# Altium PCB DB31.PcbDoc (part 6 of 8)
Units mil, origin at the board's own origin, x right, y up, seen from the top; angles counter-clockwise.
Board outline 3236.22 x 4456.69 mil, 8 copper layers (Top Layer, MidLayer1, MidLayer2, GND-Layer5, MidLayer3, VCC, MidLayer4, Bottom Layer), stack 61.8 mil thick; 226 components, 469 nets, 1815 pads, 1562 vias.
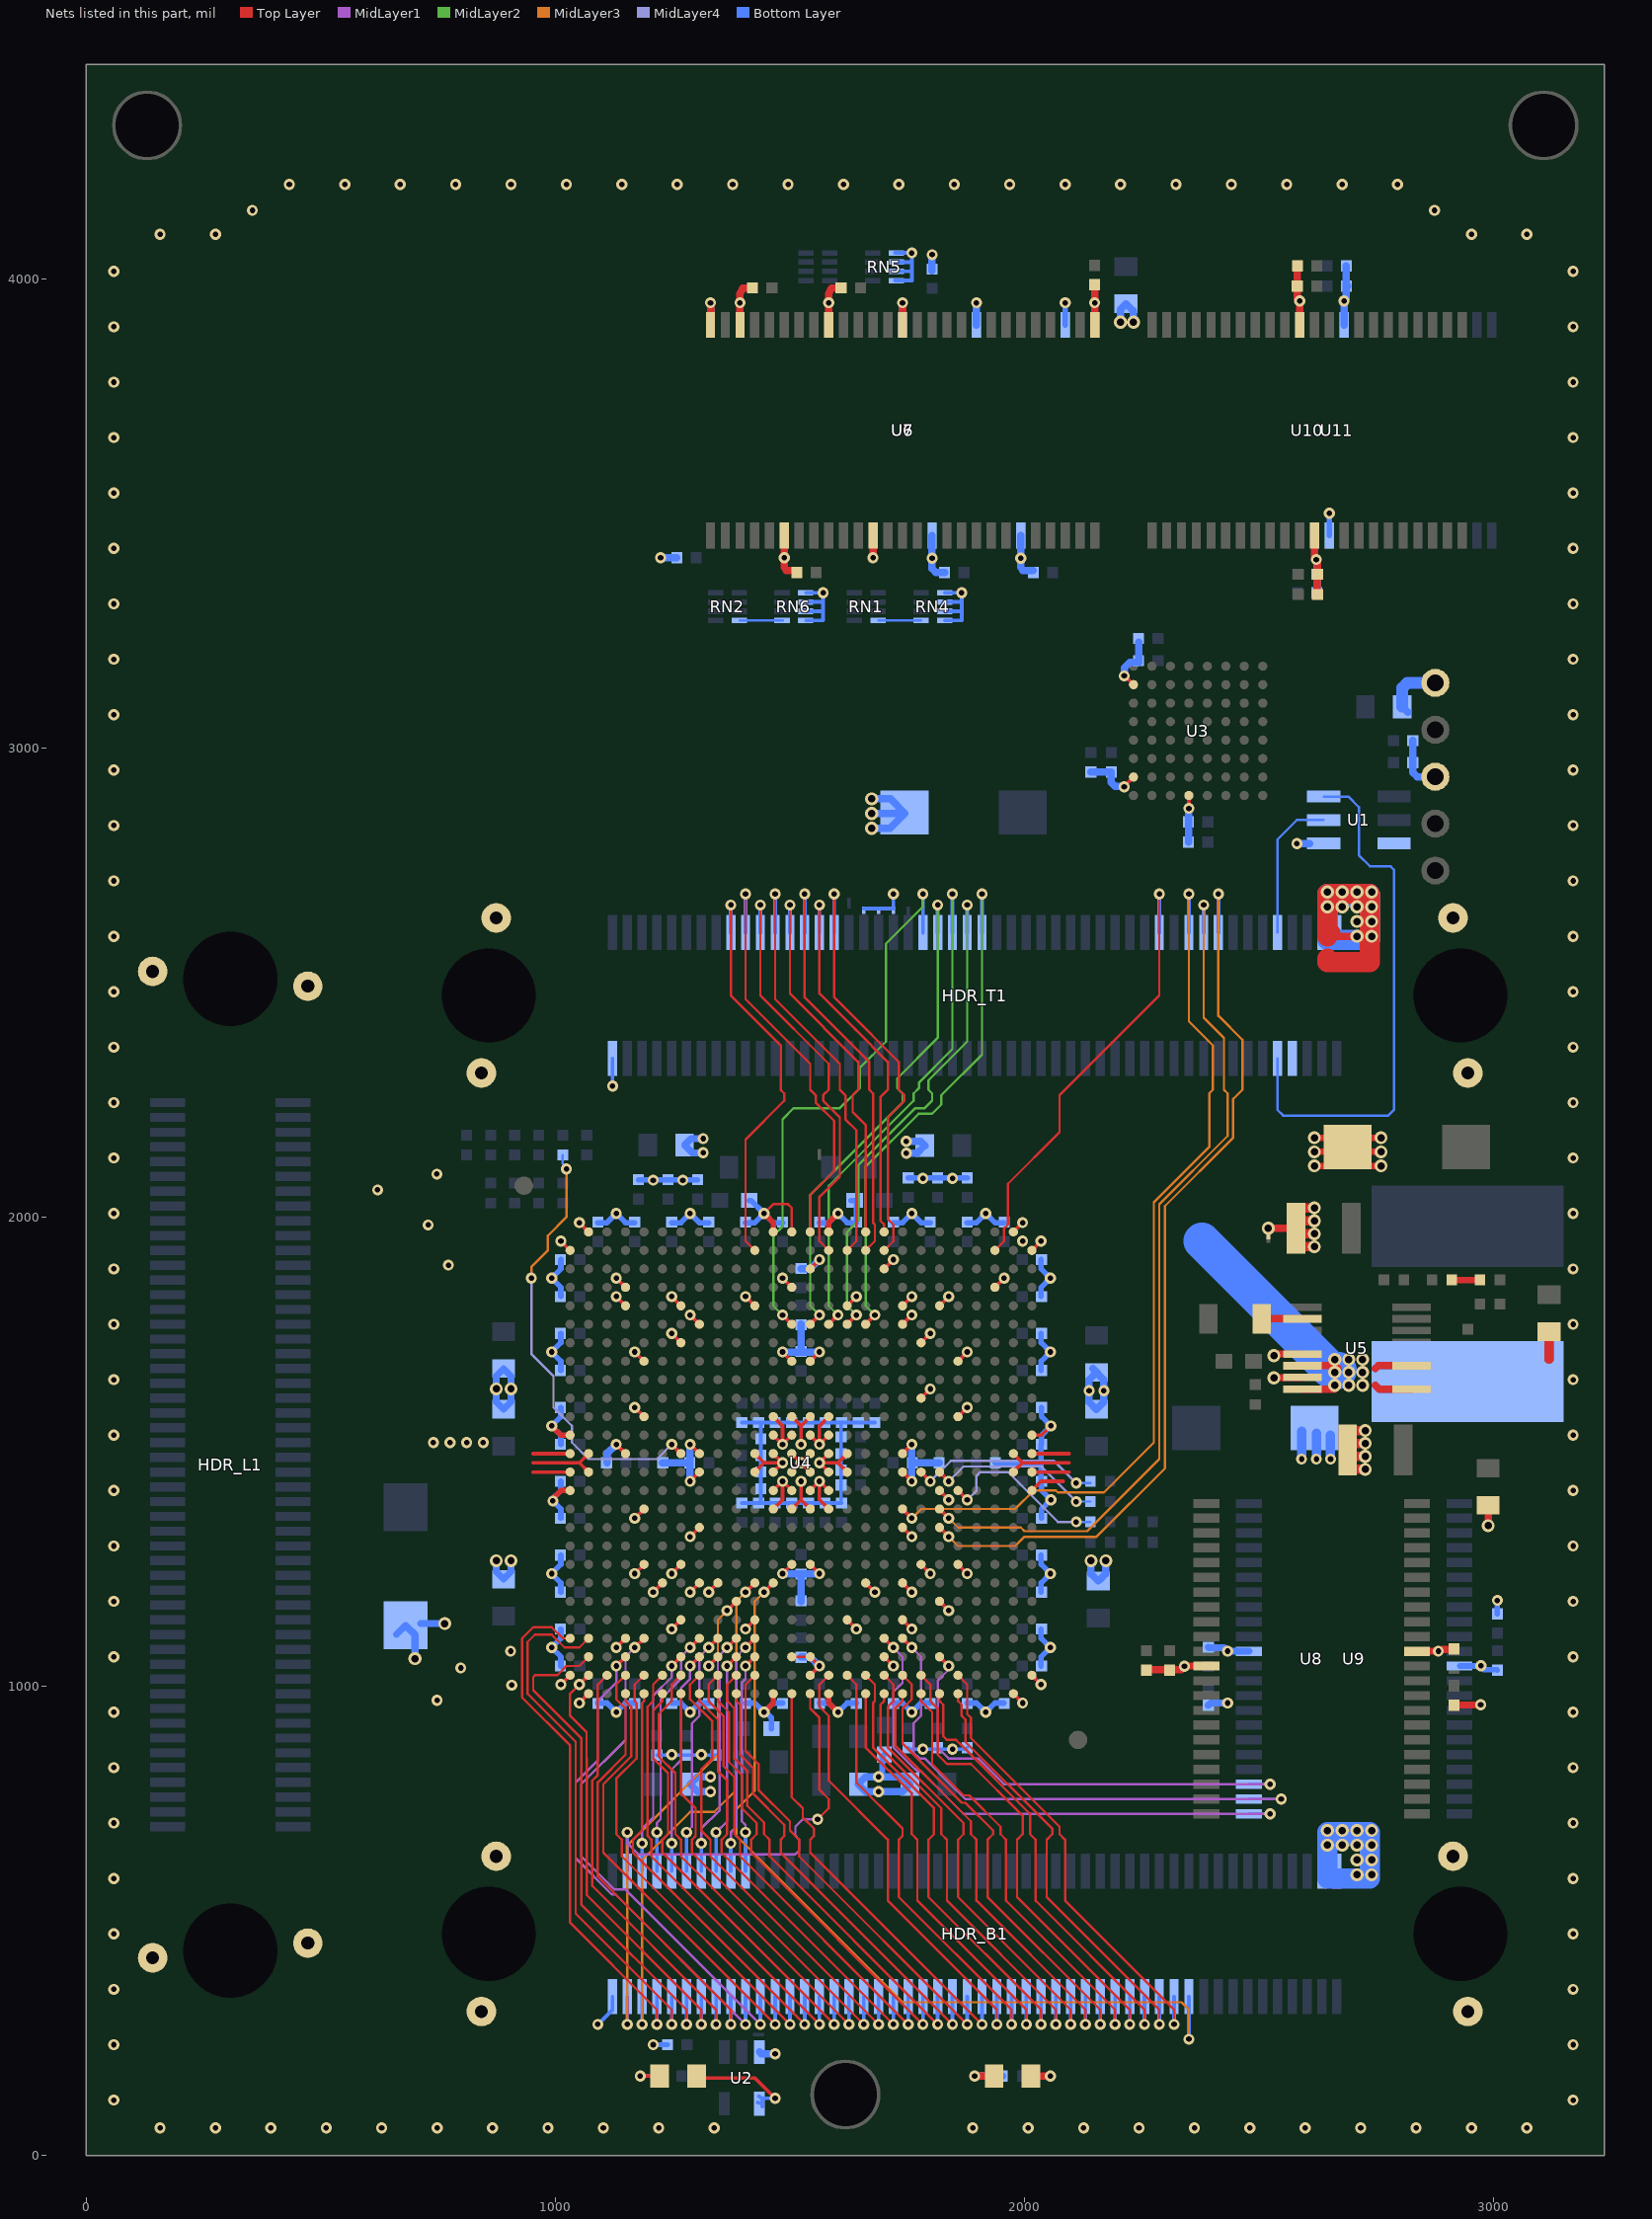
[diagram p12: the nets of this part, all layers, seen from the top]

## Via types
v1: diameter 23.62, hole 11.81, Top Layer to Bottom Layer, 947 vias
v2: diameter 23.62, hole 11.81, Top Layer to Bottom Layer, tented both sides, 476 vias
v3: diameter 27.56, hole 15.75, Top Layer to Bottom Layer, 138 vias
v4: diameter 23.62, hole 11.81, Top Layer to Bottom Layer, tented top, 1 vias

## Nets (pads, with @x,y where several pads share a name; then routed paths per layer and width w, separated by ;. In a path a pad name is that pad's centre, name@x,y a point inside that pad or via, vN(x,y) a via of type N, cw(c..) or ccw(c..) an arc to the next point about the centre after c; other vN are vias at no path point) (continued)
GND: C1.1 C2.2 C3.2 C4.2 C5.2 C6.2 C7.2 C8.2 C9.2 C10.2 C11.2 C12.2 C13.2 C14.2 C15.2 C16.2 C17.2 C18.2 C19.2 C20.2 C21.2 C22.2 C23.2 C24.2 C25.2 C26.2 C27.2 C28.2 C29.2 C30.2 C31.2 C32.2 C33.2 C34.2 C35.2 C36.2 C37.2 C38.2 C39.2 C40.2 C41.2 C42.2 C43.2 C44.2 C45.2 C46.2 C47.2 C48.2 C49.2 C50.2 C51.2 C52.2 C53.2 C54.2 C55.2 C56.2 C57.2 C58.2 C59.2 C60.2 C61.2 C62.2 C63.2 C64.2 C65.2 C66.2 C67.2 C68.2 C69.2 C70.2 C71.2 C72.2 C73.2 C74.2 C75.2 C76.2 C77.2 C78.2 C79.2 C80.2 C81.2 C82.2 C83.2 C84.2 C85.2 C86.2 C87.2 C88.2 C89.2 C90.2 C91.2 C92.2 C93.2 C94.2 C95.2 C96.2 C97.2 C98.2 C99.2 C100.2 C101.1 C102.2 C103.2 C104.2 C105.2 C106.2 C107.2 C108.2 C109.2 C110.2 C111.2 C112.2 C113.2 C114.2 C115.2 C116.2 C117.2 C118.2 C119.2 C120.2 C121.2 C122.2 C123.2 C124.2 C125.2 C128.2 C129.2 C130.2 C131.2 C132.2 C134.2 C135.2 C136.2 C137.2 C138.2 C139.2 C140.2 C141.2 C142.2 C143.2 C144.2 C145.2 C146.2 C147.2 C148.2 C149.2 C150.2 C151.2 C152.2 C153.2 C154.2 C155.2 C156.2 C157.2 HDR_B1.1 HDR_B1.98 HDR_B1.100 HDR_B1.MH1 HDR_B1.MH2 HDR_B1.MH3 HDR_B1.MH4 HDR_L1.MH1 HDR_L1.MH2 HDR_L1.MH3 HDR_L1.MH4 HDR_T1.1 HDR_T1.98 HDR_T1.100 HDR_T1.MH1 HDR_T1.MH2 HDR_T1.MH3 HDR_T1.MH4 LED2.2 NT5.2 NT6.2 NT7.2 NT8.2 RN4.1 RN4.2 RN4.3 RN4.4 RN5.1 RN5.2 RN5.3 RN5.4 RN6.1 RN6.2 RN6.3 RN6.4 TP1.1 TP3.1 U1.1 U2.3 U3.E8 U3.H2 U3.H7 U4.A2 U4.A12 U4.A13 U4.A15 U4.A25 U4.AA21 U4.AB7 U4.AB11 U4.AB16 U4.AB19 U4.AC4 U4.AD9 U4.AD13 U4.AD14 U4.AD18 U4.AE1 U4.AE14 U4.AE26 U4.AF2 U4.AF12 U4.AF15 U4.AF25 U4.B1 U4.B26 U4.C14 U4.C18 U4.D4 U4.D13 U4.D24 U4.E4 U4.E7 U4.E11 U4.E16 U4.E19 U4.E21 U4.F8 U4.F19 U4.G7 U4.G20 U4.H5 U4.H13 U4.H14 U4.H22 U4.K20 U4.L5 U4.L12 U4.L13 U4.L14 U4.L15 U4.L22 U4.M1 U4.M12 U4.M13 U4.M14 U4.M15 U4.M26 U4.N1 U4.N2 U4.N4 U4.N8 U4.N11 U4.N12 U4.N13 U4.N14 U4.N15 U4.N16 U4.N19 U4.N25 U4.N26 U4.P1 U4.P2 U4.P8 U4.P11 U4.P12 U4.P13 U4.P14 U4.P15 U4.P16 U4.P19 U4.P25 U4.P26 U4.R1 U4.R12 U4.R13 U4.R14 U4.R15 U4.R21 U4.R26 U4.T5 U4.T12 U4.T13 U4.T14 U4.T15 U4.U8 U4.U19 U4.W5 U4.W7 U4.W13 U4.W14 U4.W20 U4.W22 U4.Y6 U4.Y8 U4.Y9 U4.Y17 U4.Y19 U5.13 U5.15 U6.6 U6.12 U6.28 U6.41 U6.46 U6.52 U6.54 U7.6 U7.12 U7.28 U7.41 U7.46 U7.52 U7.54 U8.12 U8.34 U9.12 U9.34 U10.12 U10.34 U11.12 U11.34 | length 16400.1
  Top Layer w5: v1(1444.88,2007.87) 1464.57,2027.56 1496.06,2027.56 1503.94,2019.68 U4.A13@1503.94,1968.5 ; U4.AD13@1503.94,1062.99 U4.AD14@1543.31,1062.99
  Top Layer w7.87: 952.76,1456.69 U4.P1@1031.5,1456.69 ; 952.76,1476.38 1011.81,1476.38 1051.18,1476.38 ; 952.76,1496.06 U4.N1@1031.5,1496.06 ; v1(1011.81,1003.93) U4.AE1@1031.5,1023.62 ; v1(1011.81,1948.82) U4.B1@1031.5,1929.13 ; v1(1051.18,964.56) U4.AF2@1070.87,984.25 ; v1(1051.18,1988.19) U4.A2@1070.87,1968.5 ; U4.P2@1070.87,1456.69 1051.18,1476.38 ; U4.N2@1070.87,1496.06 1051.18,1476.38 ; v1(1129.92,1082.67) U4.AC4@1149.61,1102.36 ; v1(1129.92,1515.75) U4.N4@1149.61,1496.06 ; v1(1129.92,1830.71) U4.E4@1149.61,1811.02 ; v1(1129.92,1870.08) U4.D4@1149.61,1850.39 ; v1(1169.29,1240.16) U4.W5@1188.98,1259.84 ; v1(1169.29,1358.27) U4.T5@1188.98,1377.95 ; v1(1169.29,1594.49) U4.L5@1188.98,1574.8 ; v1(1169.29,1712.6) U4.H5@1188.98,1692.91 ; v1(1208.66,1200.78) U4.Y6@1228.35,1220.47 ; v1(1248.03,1122.04) U4.AB7@1267.72,1141.73 ; v1(1248.03,1240.16) U4.W7@1267.72,1259.84 ; v1(1248.03,1751.97) U4.G7@1267.72,1732.28 ; v1(1248.03,1830.71) U4.E7@1267.72,1811.02 ; v1(1287.4,1200.78) U4.Y8@1307.09,1220.47 ; v1(1287.4,1318.9) U4.U8@1307.09,1338.58 ; v1(1287.4,1437.01) U4.P8@1307.09,1456.69 ; v1(1287.4,1515.75) U4.N8@1307.09,1496.06 ; v1(1287.4,1791.34) U4.F8@1307.09,1771.65 ; v1(1326.77,1043.3) U4.AD9@1346.46,1062.99 ; v1(1326.77,1200.78) U4.Y9@1346.46,1220.47 ; v1(1405.51,1122.04) U4.AB11@1425.2,1141.73 ; v1(1405.51,1830.71) U4.E11@1425.2,1811.02 ; U4.P11@1425.2,1456.69 1444.88,1476.38 ; U4.N11@1425.2,1496.06 1444.88,1476.38 ; U4.T12@1464.57,1377.95 1484.25,1397.64 v1(1484.25,1437.01) ; U4.R12@1464.57,1417.32 v1(1484.25,1437.01) ; U4.P12@1464.57,1456.69 v1(1484.25,1476.38) ; U4.N12@1464.57,1496.06 v1(1484.25,1476.38) ; U4.M12@1464.57,1535.43 v1(1484.25,1515.75) ; U4.L12@1464.57,1574.8 1484.25,1555.12 v1(1484.25,1515.75) ; v1(1484.25,1240.15) U4.W13@1503.94,1259.84 ; v1(1484.25,1712.6) U4.H13@1503.94,1692.91 ; v1(1484.25,1870.08) U4.D13@1503.94,1850.39 ; U4.T13@1503.94,1377.95 1523.62,1397.64 ; U4.R13@1503.94,1417.32 v1(1484.25,1437.01) ; U4.P13@1503.94,1456.69 v1(1523.62,1476.38) ; U4.N13@1503.94,1496.06 v1(1523.62,1476.38) ; U4.M13@1503.94,1535.43 v1(1484.25,1515.75) ; U4.L13@1503.94,1574.8 1523.62,1555.12 ; v1(1523.62,1437.01) 1523.62,1397.64 ; v1(1523.62,1515.75) 1523.62,1555.12 ; U4.AE14@1543.31,1023.62 v1(1562.99,1043.3) U4.AD14@1543.31,1062.99 ; U4.W14@1543.31,1259.84 v1(1562.99,1240.16) ; U4.T14@1543.31,1377.95 1523.62,1397.64 ; U4.R14@1543.31,1417.32 v1(1562.99,1437.01) ; U4.P14@1543.31,1456.69 v1(1523.62,1476.38) ; U4.N14@1543.31,1496.06 v1(1523.62,1476.38) ; U4.M14@1543.31,1535.43 v1(1562.99,1515.75) ; U4.L14@1543.31,1574.8 1523.62,1555.12 ; U4.H14@1543.31,1692.91 v1(1562.99,1712.6) ; U4.C14@1543.31,1889.76 v1(1562.99,1909.45) ; U4.T15@1582.68,1377.95 1562.99,1397.64 v1(1562.99,1437.01) ; U4.R15@1582.68,1417.32 v1(1562.99,1437.01) ; U4.P15@1582.68,1456.69 v1(1562.99,1476.38) ; U4.N15@1582.68,1496.06 v1(1562.99,1476.38) ; U4.M15@1582.68,1535.43 v1(1562.99,1515.75) ; U4.L15@1582.68,1574.8 1562.99,1555.12 v1(1562.99,1515.75) ; U4.AB16@1622.05,1141.73 v1(1641.73,1122.04) ; U4.P16@1622.05,1456.69 1602.36,1476.38 ; U4.N16@1622.05,1496.06 1602.36,1476.38 ; U4.E16@1622.05,1811.02 v1(1641.73,1830.71) ; U4.Y17@1661.42,1220.47 v1(1681.1,1200.78) ; U4.AD18@1700.79,1062.99 v1(1720.47,1043.3) ; U4.C18@1700.79,1889.76 v1(1720.47,1909.45) ; U4.AB19@1740.16,1141.73 v1(1759.84,1122.04) ; U4.Y19@1740.16,1220.47 v1(1759.84,1200.78) ; U4.U19@1740.16,1338.58 v1(1759.84,1318.9) ; U4.P19@1740.16,1456.69 v1(1759.84,1437.01) ; U4.N19@1740.16,1496.06 v1(1759.84,1515.75) ; U4.F19@1740.16,1771.65 v1(1759.84,1791.34) ; U4.E19@1740.16,1811.02 v1(1759.84,1830.71) ; U4.W20@1779.53,1259.84 v1(1799.22,1240.16) ; U4.K20@1779.53,1614.17 v1(1799.22,1633.86) ; U4.G20@1779.53,1732.28 v1(1799.21,1751.97) ; U4.AA21@1818.9,1181.1 v1(1838.59,1161.41) ; U4.R21@1818.9,1417.32 v1(1838.59,1397.64) ; U4.E21@1818.9,1811.02 v1(1838.58,1830.71) ; U4.W22@1858.27,1259.84 v1(1877.96,1240.16) ; U4.L22@1858.27,1574.8 v1(1877.96,1594.49) ; U4.H22@1858.27,1692.91 v1(1877.96,1712.6) ; U4.D24@1937.01,1850.39 v1(1956.7,1870.08) ; U4.AF25@1976.38,984.25 v1(1996.07,964.57) ; U4.P25@1976.38,1456.69 1996.06,1476.38 ; U4.N25@1976.38,1496.06 1996.06,1476.38 ; U4.A25@1976.38,1968.5 v1(1996.06,1988.19) ; U4.AE26@2015.75,1023.62 v1(2035.44,1003.94) ; U4.R26@2015.75,1417.32 2035.43,1437.01 2082.68,1437.01 ; U4.P26@2015.75,1456.69 2094.49,1456.69 ; U4.N26@2015.75,1496.06 2094.49,1496.06 ; U4.M26@2015.75,1535.43 2036.42,1535.43 v1(2056.1,1555.11) ; U4.B26@2015.75,1929.13 v1(2035.43,1948.82) ; 2094.49,1476.38 1996.06,1476.38 ; v1@2212.6,2918.31 U3.H7@2232.28,2937.99 ; v1@2212.6,3154.53 U3.H2@2232.28,3134.84 ; v1(2350.4,2871.07) U3.E8@2350.39,2898.62 ; 1444.88,1476.38 v1(1484.25,1476.38) ; v1(1562.99,1476.38) 1602.36,1476.38
  Top Layer w11.81: v1@992.13,1397.64 1011.81,1417.32 U4.R1@1031.5,1417.32 ; v1(992.13,1555.12) 1011.81,1535.43 U4.M1@1031.5,1535.43 ; v1(1444.88,944.88) 1464.57,964.57 U4.AF12@1464.57,984.25 ; v1(1444.88,2007.87) 1464.57,1988.19 U4.A12@1464.57,1968.5 ; U4.AF15@1582.68,984.25 1582.68,964.57 v1(1602.36,944.88) ; U4.A15@1582.68,1968.5 1582.68,1988.19 v1(1602.36,2007.87)
  Top Layer w13.78: v3(2618.11,2109.29) C128.2@2669.08,2109.29 ; v3(2618.11,2139.29) C128.2@2669.08,2139.29 ; v3(2618.11,2169.29) C128.2@2669.08,2169.29 ; C128.2@2709.01,2109.29 v3(2759.99,2109.29) ; C128.2@2709.01,2139.29 v3(2759.99,2139.29) ; C128.2@2709.01,2169.29 v3(2759.99,2169.29)
  Top Layer w15: C145.2@2259.84,1034.45 2260.82,1035.43 2334.65,1035.43 2341,1041.79 v1(2341,1043) 2341.3,1043.3 U8.34@2387.89,1043.3 ; v3(2531.5,1657.48) 2532.26,1658.25 U5.15@2591.08,1658.25 ; v3(2531.5,1704.72) 2535.43,1708.66 U5.13@2590.55,1708.66 ; U8.12@2836.71,1074.8 2881.8,1074.8 v1(2882,1075) 2886.02,1075 2889.76,1078.74 2914.47,1078.74 C142.2@2915.44,1079.71 ; C144.2@2915.3,957.92 2917.32,957.76 2914.45,960.63 v1(2972.44,960.63)
  Top Layer w15.75: U6.54@1330.71,3901.57 v2(1330.71,3948.82) ; U6.52@1393.7,3901.57 v2(1393.7,3948.82) ; v2@1393.7,3944.88 1393.7,3964.57 ; 1393.7,3968.51 1399.61,3980.32 C138.2@1420.27,3980.31 ; C138.2@1416.34,3980.32 C138.2@1418.31,3978.34 ; U6.6@1488.19,3452.76 1488.19,3409.45 v2(1488.19,3405.51) 1488.19,3385.83 1492.13,3377.95 C135.2@1514.77,3377.95 ; U6.46@1582.68,3901.57 v2(1582.68,3948.82) ; v2@1582.68,3944.88 1582.68,3964.57 1582.68,3968.51 1588.58,3980.32 C139.2@1609.25,3980.31 ; v2(1677.17,3405.51) U6.12@1677.17,3452.76 ; U6.41@1740.16,3901.57 v2(1740.16,3948.82) ; LED2.2@2011.81,169.29 v1(2055.12,169.29) ; U6.28@2149.61,3901.57 C134.2@2149.6,3987.2 ; v3(2519.68,1976.38) C132.2@2582.67,1976.38 ; C151.2@2580.43,4028.54 C151.2@2580.57,4028.67 ; C151.2@2581.69,4027.55 2581.69,3957.68 v2(2586.61,3952.76) U10.34@2586.61,3901.57 ; U10.12@2618.11,3452.76 2618.11,3405.51 2624.72,3398.9 C154.2@2624.72,3370.07 C154.2@2625.71,3371.06 ; C150.2@2623.74,3329.72 2623.74,3370.07 C154.2@2623.77,3370.23 ; 2645.67,2598.43 v3(2708.66,2598.43) ; v3(2988.19,1342.52) C129.2@2988.18,1385.82
  Top Layer w19.68: 2645.67,2551.18 2649.61,2555.12 ; 3118.09,1696.83 C131.2@3118.1,1755.9
  Top Layer w20: C132.2@2578.73,1937 v3(2618.1,1937) ; C132.2@2578.73,1964.56 v3(2618.1,1964.56) ; C132.2@2578.73,1992.12 v3(2618.1,1992.12) ; C132.2@2578.73,2019.68 v3(2618.1,2019.68) ; C130.2@2687.01,1462.59 v3(2726.38,1462.59) ; C130.2@2687.01,1490.15 v3(2726.38,1490.15) ; C130.2@2687.01,1517.71 v3(2726.38,1517.71) ; C130.2@2687.01,1545.27 v3(2726.38,1545.27)
  Top Layer w39.37: 2645.67,2606.3 2653.54,2606.3
  Top Layer w43.31: 2645.67,2551.18 2645.67,2543.31 2736.22,2543.31 2736.22,2688.98 2645.67,2688.98 2645.67,2598.43
  Bottom Layer w7.87: v2(1090.55,279.53) 1122.05,311.02 HDR_B1.1@1122.05,338.58 ; v2(1122.05,2279.53) HDR_T1.1@1122.05,2338.58 ; C110.2@1216.53,853.34 C108.2@1342.52,853.34 ; C29.2@1397.64,1390.75 C26.2@1610.23,1390.75 ; C7.2@1397.64,1562 C11.2@1681.1,1562 ; C16.2@1437.99,1390.75 C19.2@1437.99,1527.56 C20.2@1437.99,1562 ; RN6.4@1534.64,3271.65 1570.87,3271.65 v1(1570.87,3330.71) RN6.1@1534.64,3330.71 ; RN6.3@1534.64,3291.34 1570.87,3291.34 ; RN6.2@1534.64,3311.02 1570.87,3311.02 ; C26.2@1609.25,1390.75 C10.2@1609.25,1562 ; NT7.2@1657.48,2657.48 1720.47,2657.48 v2(1720.47,2688.98) ; RN5.4@1723.62,3996.06 1759.84,3996.06 v1(1759.84,4055.12) RN5.1@1723.62,4055.12 ; RN5.3@1723.62,4015.75 1759.84,4015.75 ; RN5.2@1723.62,4035.43 1759.84,4035.43 ; C120.2@1751.97,869.09 1754.92,866.14 1875,866.14 C122.2@1877.95,869.09 ; RN4.4@1829.92,3271.65 1866.14,3271.65 v1(1866.14,3330.71) RN4.1@1829.92,3330.71 ; RN4.3@1829.92,3291.34 1866.14,3291.34 ; RN4.2@1829.92,3311.02 1866.14,3311.02
  Bottom Layer w9.84: v1(1208.66,236.22) C101.1@1239.17,236.22
  Bottom Layer w11.81: C86.2@1011.81,1043.31 1011.81,1062.99 v1(992.13,1082.68) 1011.81,1102.36 C70.2@1011.81,1122.05 ; C69.2@1011.81,1200.79 1011.81,1220.47 v1(992.13,1240.16) 1011.81,1259.84 C72.2@1011.81,1279.53 ; C74.2@1011.81,1358.27 1011.81,1377.95 992.13,1397.64 1011.81,1417.32 C93.2@1011.81,1437.01 ; C94.2@1011.81,1515.75 1011.81,1535.43 v1(992.13,1555.12) 1011.81,1574.8 C68.2@1011.81,1594.49 ; C71.2@1011.81,1673.23 1011.81,1692.91 v1(992.13,1712.6) 1011.81,1732.28 C67.2@1011.81,1751.97 ; C73.2@1011.81,1830.71 1011.81,1850.39 v1(992.13,1870.08) 1011.81,1889.76 C95.2@1011.81,1909.45 ; C85.2@1090.55,964.57 1110.24,964.57 v1(1129.92,944.88) 1149.61,964.57 C75.2@1169.29,964.57 ; C92.2@1090.55,1988.19 1110.24,1988.19 v1(1129.92,2007.87) 1149.61,1988.19 C63.2@1169.29,1988.19 ; C118.2@1177.16,2079.72 C116.2@1303.15,2079.72 ; C81.2@1248.03,964.57 1267.72,964.57 v1(1287.4,944.88) 1307.09,964.57 C80.2@1326.77,964.57 ; C66.2@1248.03,1988.19 1267.72,1988.19 v1(1287.4,2007.87) 1307.09,1988.19 C64.2@1326.77,1988.19 ; C78.2@1405.51,964.57 1425.2,964.57 v1(1444.88,944.88) ; C65.2@1405.51,1988.19 1425.2,1988.19 v1(1444.88,2007.87) ; C119.2@1413.39,2035.43 1417.33,2035.43 v1(1444.88,2007.87) ; C111.2@1460.63,909.45 1460.63,933.07 1448.82,944.88 v1(1444.88,944.88) ; C87.2@1484.25,964.57 1464.57,964.57 v1(1444.88,944.88) ; C91.2@1484.25,1988.19 1464.57,1988.19 v1(1444.88,2007.87) ; C84.2@1562.99,964.57 1582.68,964.57 v1(1602.36,944.88) 1622.05,964.57 C76.2@1641.73,964.57 ; C98.2@1562.99,1988.19 1582.68,1988.19 v1(1602.36,2007.87) 1622.05,1988.19 C59.2@1641.73,1988.19 ; C115.2@1629.92,2035.43 C115.2@1637.79,2035.43 1641.73,2031.49 C59.2@1641.73,1989.17 ; v1(1688.98,807.09) 1696.85,814.96 1696.85,850.39 C123.2@1700.78,854.33 ; C79.2@1720.47,964.57 1740.16,964.57 v1(1759.84,944.88) 1779.53,964.57 C77.2@1799.21,964.57 ; C62.2@1720.47,1988.19 1740.16,1988.19 v1(1759.84,2007.87) 1779.53,1988.19 C61.2@1799.21,1988.19 ; C112.2@1751.97,2083.66 C114.2@1877.95,2083.66 ; C82.2@1877.95,964.57 1897.64,964.57 v1(1917.32,944.88) 1937.01,964.57 C90.2@1956.7,964.57 ; C60.2@1877.95,1988.19 1897.64,1988.19 v1(1917.32,2007.87) 1937.01,1988.19 C83.2@1956.69,1988.19 ; C46.2@1937.01,1476.38 C46.2@1938,1476.38 2035.44,1476.38 ; C88.2@2035.44,1043.31 2035.44,1062.99 v1(2055.12,1082.68) 2035.44,1102.36 C52.2@2035.44,1122.05 ; C54.2@2035.44,1200.79 2035.44,1220.47 v1(2055.12,1240.16) 2035.44,1259.84 C51.2@2035.44,1279.53 ; C96.2@2035.44,1437.01 C53.2@2035.44,1515.74 ; C55.2@2035.44,1673.23 2035.44,1692.91 v1(2055.12,1712.6) 2035.44,1732.28 C56.2@2035.44,1751.97 ; C57.2@2035.44,1830.71 2035.44,1850.39 v1(2055.12,1870.08) 2035.44,1889.76 C89.2@2035.44,1909.45 ; C97.2@2036.42,1358.27 2036.42,1377.95 v1(2056.1,1397.64) 2036.42,1417.32 C96.2@2036.42,1437.01 ; C53.2@2036.41,1515.74 2036.41,1535.43 v1(2056.1,1555.11) 2036.41,1574.8 C58.2@2036.41,1594.49 ; U7.52@2086.61,3901.57 v2(2086.61,3948.82) ; U7.54@2149.61,3901.57 v2(2149.61,3948.82) ; U11.12@2649.61,3452.76 v2(2649.61,3500) ; U9.34@2927.25,1043.3 v1@2972.3,1043.3 ; v1(2973,1044) v1@2972.3,1043.3 ; C149.2@3007.87,1034.45 3006.88,1035.43 2979.33,1035.43 2972.3,1042.47 v1@2972.3,1043.3 ; C147.2@3007.87,1154.53 v1(3007.87,1183.07)
  Bottom Layer w15: C99.2@661.42,1110.59 C99.2@680.83,1130 700.79,1110.04 v3(700.79,1059.06) ; C99.2@712.6,1133.86 v3(764.13,1133.86) ; v3(874.02,1267.72) 874.02,1244.09 C38.2@889.76,1228.34 905.51,1244.09 v3(905.51,1267.72) ; v1@1314.96,2137.14 v1(1315.08,2137.24) ; v1@1315.08,2137.14 1291.99,2137.14 C35.2@1275.59,2153.54 1289.29,2167.24 v1(1315.08,2167.24) ; v2(1330.71,775.59) 1303.15,775.59 C42.2@1287.4,791.34 1303.15,807.09 v2(1330.71,807.09) ; v1@1748.03,2139.93 1748.03,2132.31 v1(1748.27,2136.26) ; v1(1748.27,2136.26) 1771.23,2136.24 C37.2@1787.52,2152.54 ; C146.2@2391.82,959.64 2396.75,964.57 v1(2433.07,964.57) ; C148.2@2391.82,1083.65 2392.8,1082.68 2425.2,1082.68 2432.87,1075 v1(2433,1075) 2433.21,1074.79 U9.12@2478.44,1074.79 ; C4.2@874.02,1606.29 874.02,1661.42 C36.2@889.76,1677.16 905.51,1661.41 905.51,1606.3 C4.2@889.76,1590.55 C4.2@874.02,1606.29 ; C5.2@1645.67,791.34 1661.42,807.09 1740.15,807.09 C41.2@1755.9,791.34 1740.16,775.59 1661.41,775.59 C5.2@1645.67,791.34
  Bottom Layer w15.75: C44.2@1110.24,1476.38 1110.24,1496.06 v1(1129.92,1515.75) ; v2(1224.41,3405.51) C136.2@1258.85,3405.51 ; C45.2@1228.35,1476.38 C32.2@1287.4,1476.38 ; v1(1287.4,1437.01) v1(1287.4,1515.75) ; U7.28@1330.71,3901.57 v2@1330.71,3944.88 ; U2.3@1435.04,220.47 1438.97,216.54 v1(1468.5,216.54) ; v1(1484.25,1240.15) v1(1562.99,1240.16) ; v1(1484.25,1712.6) v1(1562.99,1712.6) ; C48.2@1523.62,1181.1 C33.2@1523.62,1240.15 ; C49.2@1523.62,1889.76 1543.31,1889.76 v1(1562.99,1909.45) ; C43.2@1523.63,1062.99 1543.31,1062.99 v1(1562.99,1043.3) ; C31.2@1523.63,1712.6 C47.2@1523.63,1771.65 ; v3(1674.21,2828.74) 1713.39,2828.74 1745.15,2860.51 1713.93,2891.73 v3(1674.21,2891.73) ; v3(1674.21,2860.24) C100.2@1744.88,2860.24 ; U7.41@1740.16,3901.57 v2(1740.16,3948.82) ; v1(1748.03,2161.42) 1778.65,2161.42 C37.2@1787.52,2152.54 ; v1(1759.84,1437.01) C34.2@1759.85,1476.37 ; v1(1759.84,1515.75) C34.2@1759.85,1476.38 ; U7.12@1803.15,3452.76 1803.15,3405.51 v2(1803.15,3404.53) 1803.15,3381.89 1811.04,3374.01 C141.2@1829.72,3374.01 ; C137.2@1803.15,4016.72 1803.15,4047.24 v2(1803.15,4051.18) ; C50.2@1818.9,1476.38 C34.2@1759.85,1476.38 ; U7.46@1897.64,3901.57 v2(1897.64,3948.82) v2@1897.64,3944.88 ; U7.6@1992.13,3452.76 1992.13,3385.83 1996.06,3377.95 C140.2@2018.71,3377.95 ; v3(2141.73,1267.72) 2141.73,1240.15 C40.2@2157.48,1224.41 2161.42,1228.35 2173.23,1240.16 v3(2173.23,1267.72) ; C107.2@2141.73,2948.82 C104.2@2185.04,2948.82 2185.04,2926.19 2192.92,2918.31 v1@2212.6,2918.31 ; C39.2@2145.66,1677.16 2169.29,1653.54 2169.29,1606.3 C6.2@2153.54,1590.55 2137.8,1606.29 2137.8,1653.54 C39.2@2153.54,1669.29 ; v3(2204.72,3907.48) 2204.72,3935.04 C125.2@2216.53,3946.84 2232.28,3931.1 v3(2232.28,3907.48) ; v1(2212.6,3153.54) 2212.6,3170.28 2224.41,3182.09 2243.11,3182.09 C103.2@2243.11,3225.39 ; C102.2@2349.4,2799.21 2350.4,2800.2 v1(2350.4,2871.07) ; v2(2580.71,2796.26) 2608.06,2796.26 U1.1@2608.25,2796.45 ; v2(2622.05,3401.57) 2623.03,3400.6 C152.2@2623.03,3330.7 ; v2@2681.1,3956.7 v2(2681.1,3952.76) 2686.02,3957.67 C157.2@2686.02,3984.25 ; U11.34@2681.38,3901.57 v2@2681.38,3944.88 ; C153.2@2686.02,4027.55 2686.02,3987.2 C157.2@2688.98,3984.25 ; C124.2@2805.12,3087.59 C124.2@2816.93,3075.79 ; C1.1@2827.75,3015.74 C2.2@2827.75,2968.5 2827.75,2947.84 2836.92,2938.67 TP3.1@2875.71,2938.67
  Bottom Layer w20: v1(2590.55,1484.25) C3.2@2590.55,1543.31 ; v1(2622.05,1484.25) C3.2@2622.05,1539.37 ; v1(2652.34,1484.25) C3.2@2652.34,1535.44
  Bottom Layer w25: C124.2@2805.12,3087.59 2805.12,3127.96 2815.83,3138.67 TP1.1@2875.71,3138.67
  Bottom Layer w43.31: v3@2649.61,681.1 v3@2736.22,681.1 ; v3@2649.61,2681.1 v3@2736.22,2681.1 ; v3@2736.22,681.1 2736.22,688.98 2645.67,688.98 2645.67,590.55 2736.22,590.55 2736.22,598.42 2736.22,629.92 2736.22,661.42 v3@2736.22,681.1 ; v3@2736.22,2681.1 2736.22,2688.98 2645.67,2688.98 2645.67,2590.55 2736.22,2590.55 2736.22,2598.43 2736.22,2629.92 2736.22,2661.42 v3@2736.22,2681.1
  other v1: 157.48,59.06 275.59,59.06 393.7,59.06 511.81,59.06 629.92,59.06 748.03,59.06 866.14,59.06 984.25,59.06 1102.36,59.06 1220.47,59.06 1338.58,59.06 1889.76,59.06 2007.87,59.06 2125.98,59.06 2244.09,59.06 2362.2,59.06 2480.31,59.06 2598.43,59.06 2716.54,59.06 2834.65,59.06 2952.76,59.06 3070.87,59.06 59.06,118.11 3169.29,118.11 59.06,236.22 3169.29,236.22 59.06,354.33 3169.29,354.33 59.06,472.44 3169.29,472.44 59.06,590.55 3169.29,590.55 59.06,708.66 3169.29,708.66 1688.98,775.59 59.06,826.77 3169.29,826.77 1783.46,866.14 1846.46,866.14 59.06,944.88 3169.29,944.88 747.87,970.06 907.31,1002.54 798.43,1039.08 59.06,1062.99 3169.29,1062.99 904.73,1074.88 59.06,1181.1 3169.29,1181.1 59.06,1299.21 3169.29,1299.21 994.72,1395.04 59.06,1417.32 3169.29,1417.32 740.16,1519.68 775.59,1519.68 811.02,1519.68 846.46,1519.68 59.06,1535.43 3169.29,1535.43 2137.8,1629.92 2169.29,1629.92 59.06,1653.54 3169.29,1653.54 59.06,1771.65 3169.29,1771.65 59.06,1889.76 3169.29,1889.76 772.13,1897.68 1996.06,1948.82 728.95,1983.4 59.06,2007.87 3169.29,2007.87 621.27,2058.14 1208.66,2078.74 1271.65,2078.74 1783.46,2082.68 1846.46,2082.68 747.5,2091.72 59.06,2125.98 3169.29,2125.98 59.06,2244.09 3169.29,2244.09 59.06,2362.2 3169.29,2362.2 59.06,2480.31 3169.29,2480.32 59.06,2598.43 3169.29,2598.43 59.06,2716.54 3169.29,2716.54 59.06,2834.65 3169.29,2834.65 2212.6,2917.32 59.06,2952.76 3169.29,2952.76 59.06,3070.87 3169.29,3070.87 59.06,3188.98 3169.29,3188.98 59.06,3307.09 3169.29,3307.09 59.06,3425.2 3169.29,3425.2 59.06,3543.31 3169.29,3543.31 59.06,3661.42 3169.29,3661.42 59.06,3779.53 3169.29,3779.53 59.06,3897.64 3169.29,3897.64 59.06,4015.75 3169.29,4015.75 157.48,4094.49 275.59,4094.49 2952.76,4094.49 3070.87,4094.49 354.33,4145.67 2874.02,4145.67 433.07,4200.79 551.18,4200.79 669.29,4200.79 787.4,4200.79 905.51,4200.79 1023.62,4200.79 1141.73,4200.79 1259.84,4200.79 1377.95,4200.79 1496.06,4200.79 1614.17,4200.79 1732.28,4200.79 1850.39,4200.79 1968.5,4200.79 2086.61,4200.79 2204.72,4200.79 2322.83,4200.79 2440.94,4200.79 2559.06,4200.79 2677.17,4200.79 2795.28,4200.79
  other v2: 1248.03,854.33 1311.02,854.33 1992.13,3404.53
  other v3: 2708.66,598.42 2740.16,598.42 2708.66,629.92 2740.16,629.92 2645.67,661.42 2677.17,661.42 2708.66,661.42 2740.16,661.42 2645.67,692.91 2677.17,692.91 2708.66,692.91 2740.16,692.91 874.02,1633.86 905.51,1633.86 2740.16,2598.43 2708.66,2629.92 2740.16,2629.92 2645.67,2661.42 2677.17,2661.42 2708.66,2661.42 2740.16,2661.42 2645.67,2692.91 2677.17,2692.91 2708.66,2692.91 2740.16,2692.91
IO0: HDR_B1.7 U4.AC1 | length 1122.9
  Top Layer w5: U4.AC1@1031.5,1102.36 1015.75,1102.36 992.13,1125.98 968.5,1125.98 956.69,1125.98 952.76,1125.98 929.13,1102.36 929.13,976.38 1031.5,874.02 1031.5,496.06 1216.54,311.02 v2(1216.54,279.53)
  Bottom Layer w7.87: v2(1216.54,279.53) HDR_B1.7@1216.54,338.58
IO1: HDR_B1.9 U4.AC2 | length 1157.2
  Top Layer w5: U4.AC2@1070.87,1102.36 1051.18,1082.68 1019.68,1082.68 992.13,1110.24 968.5,1110.24 956.69,1110.24 940.94,1094.49 940.94,984.25 1043.31,881.89 1043.31,515.75 1248.03,311.02 v2(1248.03,279.53)
  Bottom Layer w7.87: v2(1248.03,279.53) HDR_B1.9@1248.03,338.58
IO2: HDR_B1.11 U4.AD2 | length 1070.6
  Top Layer w5: U4.AD2@1070.87,1062.99 1051.18,1043.31 1023.62,1043.31 1003.94,1023.62 968.5,1023.62 956.69,1023.62 952.76,1019.68 952.76,992.13 1055.12,889.76 1055.12,535.43 1279.53,311.02 v2(1279.53,279.53)
  Bottom Layer w7.87: v2(1279.53,279.53) HDR_B1.11@1279.53,338.58
IO3: HDR_B1.13 U4.AE2 | length 935.2
  Top Layer w5: v1(1051.18,1003.93) 1031.5,984.25 1031.5,956.69 1031.5,944.88 1031.5,937.01 1066.44,902.07 1066.44,846.95 1066.93,846.46 1066.93,555.12 1311.02,311.02 v2(1311.02,279.53)
  Top Layer w7.87: v1(1051.18,1003.93) U4.AE2@1070.87,1023.62
  Bottom Layer w7.87: v2(1311.02,279.53) HDR_B1.13@1311.03,338.58
IO4: HDR_B1.15 U4.AE3 | length 925.5
  Top Layer w5: U4.AE3@1110.24,1023.62 1090.55,1003.94 1090.55,921.26 1090.55,909.45 1090.55,811.02 1078.74,799.21 1078.74,574.8 1342.52,311.02 v2(1342.52,279.53)
  Bottom Layer w7.87: v2(1342.52,279.53) HDR_B1.15@1342.52,338.58
IO5: HDR_B1.17 U4.AE4 | length 961.3
  Top Layer w5: U4.AE4@1149.61,1023.62 1129.92,1003.94 1129.92,972.44 1149.61,952.76 1149.61,921.26 1149.61,909.45 1149.61,854.33 1090.55,795.28 1090.55,594.49 1374.02,311.02 v2(1374.02,279.53)
  Bottom Layer w7.87: v2(1374.02,279.53) HDR_B1.17@1374.02,338.58
IO6: HDR_B1.19 U4.AD4 | length 1041.2
  Top Layer w7.87: v1(1129.92,1043.3) U4.AD4@1149.61,1062.99
  MidLayer1 w5: v1(1129.92,1043.3) 1129.92,1007.87 1090.55,968.5 1090.55,921.26 1090.55,909.45 1090.55,842.52 1043.31,795.27 1043.31,633.86 1120.32,556.84 1128.2,556.84 v2(1405.51,279.53)
  Bottom Layer w7.87: v2(1405.51,279.53) HDR_B1.19@1405.51,338.58
IO7: HDR_B1.21 U4.AC5 | length 1109.4
  Top Layer w7.87: v1(1169.29,1082.67) U4.AC5@1188.98,1102.36
  MidLayer1 w5: v1(1169.29,1082.67) 1149.61,1062.99 1149.61,921.26 1149.61,909.45 1149.61,885.83 1055.12,791.34 1055.12,637.8 1125.98,566.93 1149.61,566.93 v2(1437.01,279.53)
  Bottom Layer w7.87: v2(1437.01,279.53) HDR_B1.21@1437.01,338.58
IO8: HDR_B1.23 U4.AF4 | length 944.8
  Top Layer w5: U4.AF4@1149.61,984.25 1149.61,968.51 1161.42,956.7 1161.42,921.26 1161.42,909.45 1161.42,850.39 1102.36,791.34 1102.36,645.67 v2(1468.5,279.53)
  Bottom Layer w7.87: v2(1468.5,279.53) HDR_B1.23@1468.51,338.58
IO9: HDR_B1.25 U4.AE5 | length 984.2
  Top Layer w5: U4.AE5@1188.98,1023.62 1169.29,1003.94 1169.29,968.5 1173.23,964.57 1173.23,921.26 1173.23,909.45 1173.23,846.46 1129.92,803.15 1129.92,685.04 1141.73,673.23 1141.73,637.79 v2(1500,279.53)
  Bottom Layer w7.87: v2(1500,279.53) HDR_B1.25@1500,338.58
IO10: HDR_B1.27 U4.AF5 | length 925.2
  Top Layer w5: U4.AF5@1188.98,984.25 1188.98,968.5 1185.04,964.57 1185.04,921.26 1185.04,909.45 1185.04,692.91 1165.35,673.23 1165.35,645.67 v2(1531.5,279.53)
  Bottom Layer w7.87: v2(1531.5,279.53) HDR_B1.27@1531.5,338.58
IO11: HDR_B1.29 U4.AE6 | length 967.9
  Top Layer w5: U4.AE6@1228.35,1023.62 1208.66,1003.94 1208.66,968.5 1196.85,956.69 1196.85,921.26 1196.85,909.45 1196.85,681.1 1204.72,673.23 1204.72,637.79 v2(1562.99,279.53)
  Bottom Layer w7.87: v2(1562.99,279.53) HDR_B1.29@1562.99,338.58
IO12: HDR_B1.31 U4.AF6 | length 941.5
  Top Layer w5: U4.AF6@1228.35,984.25 1228.35,968.5 1208.66,948.82 1208.66,921.26 1208.66,909.45 1208.66,846.46 1240.16,814.96 1240.16,685.04 1228.35,673.23 1228.35,645.67 v2(1594.49,279.53)
  Bottom Layer w7.87: v2(1594.49,279.53) HDR_B1.31@1594.49,338.58
IO13: HDR_B1.33 U4.AE7 | length 990.7
  Top Layer w5: U4.AE7@1267.72,1023.62 1248.03,1003.94 1248.03,968.5 1220.47,940.94 1220.47,921.26 1220.47,909.45 1220.47,850.39 1255.91,814.96 1255.91,685.04 1267.72,673.23 1267.72,637.79 v2(1625.99,279.53)
  Bottom Layer w7.87: v2(1625.99,279.53) HDR_B1.33@1625.99,338.58
IO14: HDR_B1.35 U4.AF7 | length 931.7
  Top Layer w5: U4.AF7@1267.72,984.25 1267.72,968.5 1267.72,921.26 1267.72,909.45 1267.72,771.65 1299.21,740.16 1299.21,681.1 1291.34,673.23 1291.34,645.67 v2(1657.48,279.53)
  Bottom Layer w7.87: v2(1657.48,279.53) HDR_B1.35@1657.48,338.58
IO15: HDR_B1.37 U4.AE8 | length 997.2
  Top Layer w5: U4.AE8@1307.09,1023.62 1287.4,1003.94 1287.4,972.44 1334.65,925.2 1334.65,921.26 1334.65,909.45 1334.65,846.46 1311.02,822.83 1311.02,692.91 1330.71,673.23 1330.71,637.79 v2(1688.98,279.53)
  Bottom Layer w7.87: v2(1688.98,279.53) HDR_B1.37@1688.98,338.58
IO16: HDR_B1.39 U4.AF8 | length 944.8
  Top Layer w5: U4.AF8@1307.09,984.25 1307.09,968.51 1346.46,929.14 1346.46,921.26 1346.46,909.45 1346.46,818.9 1366.14,799.21 1366.14,685.04 1354.33,673.23 1354.33,645.67 v2(1720.47,279.53)
  Bottom Layer w7.87: v2(1720.47,279.53) HDR_B1.39@1720.48,338.58
IO17: HDR_B1.41 U4.AE9 | length 987.4
  Top Layer w5: U4.AE9@1346.46,1023.62 1326.77,1003.94 1326.77,968.5 1358.27,937.01 1358.27,921.26 1358.27,909.45 1358.27,830.46 1381.89,806.84 1381.89,685.04 1393.7,673.23 1393.7,637.79 v2(1751.97,279.53)
  Bottom Layer w7.87: v2(1751.97,279.53) HDR_B1.41@1751.97,338.58
IO18: HDR_B1.43 U4.AF9 | length 954.6
  Top Layer w5: U4.AF9@1346.46,984.25 1346.46,968.5 1370.08,944.88 1370.08,921.26 1370.08,909.45 1370.08,838.58 1397.64,811.02 1397.64,740.16 1429.13,708.66 1429.13,685.04 1417.32,673.23 1417.32,645.67 v2(1783.47,279.53)
  Bottom Layer w7.87: v2(1783.47,279.53) HDR_B1.43@1783.47,338.58
IO19: HDR_B1.45 U4.AE10 | length 997.2
  Top Layer w5: U4.AE10@1385.83,1023.62 1366.14,1003.94 1366.14,968.5 1381.89,952.76 1381.89,921.26 1381.89,909.45 1381.89,846.46 1409.45,818.9 1409.45,745.08 1444.88,709.64 1444.88,685.04 1456.69,673.23 1456.69,637.79 v2(1814.96,279.53)
  Bottom Layer w7.87: v2(1814.96,279.53) HDR_B1.45@1814.96,338.58
IO20: HDR_B1.47 U4.AF10 | length 961.1
  Top Layer w5: U4.AF10@1385.83,984.25 1385.83,968.5 1393.7,960.63 1393.7,921.26 1393.7,909.45 1393.7,854.33 1421.26,826.77 1421.26,771.65 1488.19,704.72 1488.19,681.1 1480.31,673.23 1480.31,645.67 v2(1846.46,279.53)
  Bottom Layer w7.87: v2(1846.46,279.53) HDR_B1.47@1846.46,338.58
IO21: HDR_B1.49 U4.AE11 | length 1007
  Top Layer w5: U4.AE11@1425.2,1023.62 1405.51,1003.93 1405.51,921.26 1405.51,909.45 1405.51,862.2 1433.07,834.65 1433.07,779.53 1500,712.6 1500,692.91 1519.69,673.23 1519.69,637.79 v2(1877.95,279.53)
  Bottom Layer w7.87: v2(1877.95,279.53) HDR_B1.49@1877.96,338.58
IO22: HDR_B1.51 U4.AF13 | length 938.3
  Top Layer w5: U4.AF13@1503.94,984.25 1503.94,921.26 1503.94,909.45 1503.94,763.78 1527.56,740.16 1527.56,720.47 1551.18,696.85 1551.18,681.1 1543.31,673.23 1543.31,645.67 v2(1909.45,279.53)
  Bottom Layer w7.87: v2(1909.45,279.53) HDR_B1.51@1909.45,338.58
IO23: HDR_B1.53 U4.AE15 | length 967.9
  Top Layer w5: U4.AE15@1582.68,1023.62 1562.99,1003.93 1562.99,956.69 1582.68,937.01 1582.68,921.26 1582.68,909.45 1582.68,799.21 1708.66,673.23 1708.66,543.31 1940.95,311.02 v2(1940.95,279.53)
  Bottom Layer w7.87: v2(1940.95,279.53) HDR_B1.53@1940.95,338.58
IO24: HDR_B1.55 U4.AE16 | length 954.8
  Top Layer w5: U4.AE16@1622.05,1023.62 1641.73,1003.93 1641.73,921.26 1641.73,909.45 1641.73,795.28 1740.16,696.85 1740.16,681.1 1732.28,673.23 1732.28,551.18 1972.44,311.02 v2(1972.44,279.53)
  Bottom Layer w7.87: v2(1972.44,279.53) HDR_B1.55@1972.44,338.58
IO25: HDR_B1.57 U4.AF17 | length 905.7
  Top Layer w5: U4.AF17@1661.42,984.25 1661.42,921.26 1661.42,909.45 1661.42,870.08 1759.84,771.65 1759.84,685.04 1771.65,673.23 1771.65,543.31 2003.94,311.02 v2(2003.94,279.53)
  Bottom Layer w7.87: v2(2003.94,279.53) HDR_B1.57@2003.94,338.58
IO26: HDR_B1.59 U4.AE17 | length 971.1
  Top Layer w5: U4.AE17@1661.42,1023.62 1681.1,1003.94 1681.1,968.5 1677.17,964.57 1677.17,921.26 1677.17,909.45 1677.17,870.08 1807.09,740.16 1807.09,685.04 1795.27,673.23 1795.27,551.18 2035.43,311.02 v2(2035.43,279.53)
  Bottom Layer w7.87: v2(2035.43,279.53) HDR_B1.59@2035.44,338.58
IO27: HDR_B1.61 U4.AF18 | length 922
  Top Layer w5: U4.AF18@1700.79,984.25 1700.79,968.5 1692.91,960.63 1692.91,921.26 1692.91,909.45 1692.91,870.08 1822.83,740.16 1822.83,685.04 1834.64,673.23 1834.64,543.31 2066.93,311.02 v2(2066.93,279.53)
  Bottom Layer w7.87: v2(2066.93,279.53) HDR_B1.61@2066.93,338.58
IO28: HDR_B1.63 U4.AE18 | length 987.4
  Top Layer w5: U4.AE18@1700.79,1023.62 1720.47,1003.94 1720.47,968.5 1708.66,956.69 1708.66,921.26 1708.66,909.45 1708.66,870.08 1870.08,708.66 1870.08,685.04 1858.27,673.23 1858.27,551.18 2098.43,311.02 v2(2098.43,279.53)
  Bottom Layer w7.87: v2(2098.43,279.53) HDR_B1.63@2098.43,338.58
IO29: HDR_B1.65 U4.AF19 | length 938.3
  Top Layer w5: U4.AF19@1740.16,984.25 1740.16,968.51 1724.41,952.76 1724.41,921.26 1724.41,909.45 1724.41,874.02 1885.83,712.6 1885.83,685.04 1897.64,673.23 1897.64,543.31 2129.92,311.02 v2(2129.92,279.53)
  Bottom Layer w7.87: v2(2129.92,279.53) HDR_B1.65@2129.92,338.58
IO30: HDR_B1.67 U4.AE19 | length 1008.3
  Top Layer w5: U4.AE19@1740.16,1023.62 1759.84,1003.94 1759.84,972.44 1740.16,952.76 1740.16,921.26 1740.16,909.45 1740.16,877.95 1866.14,751.97 1874.02,751.97 1933.07,692.91 1933.07,685.04 1921.26,673.23 1921.26,551.18 2161.42,311.02 v2(2161.42,279.53)
  Bottom Layer w7.87: v2(2161.42,279.53) HDR_B1.67@2161.42,338.58
IO31: HDR_B1.69 U4.AF20 | length 941.9
  Top Layer w5: U4.AF20@1779.53,984.25 1779.53,968.5 1803.15,944.88 1803.15,921.26 1803.15,909.45 1803.15,834.65 1870.08,767.72 1881.89,767.72 1948.82,700.79 1948.82,685.04 1960.63,673.23 1960.63,543.31 2192.91,311.02 v2(2192.91,279.53)
  Bottom Layer w7.87: v2(2192.91,279.53) HDR_B1.69@2192.92,338.58
IO32: HDR_B1.71 U4.AE20 | length 1027.2
  Top Layer w5: U4.AE20@1779.53,1023.62 1799.21,1003.94 1799.21,968.5 1814.96,952.75 1814.96,921.26 1814.96,909.45 1814.96,854.33 1834.65,834.65 1885.83,834.65 1996.06,724.41 1996.06,685.04 1984.25,673.23 1984.25,551.18 2224.41,311.02 v2(2224.41,279.53)
  Bottom Layer w7.87: v2(2224.41,279.53) HDR_B1.71@2224.41,338.58
IO33: HDR_B1.73 U4.AF21 | length 956.3
  Top Layer w5: U4.AF21@1818.9,984.25 1818.9,968.5 1826.77,960.63 1826.77,921.26 1826.77,909.45 1826.77,893.7 1834.65,885.83 1854.33,885.83 1866.14,874.02 2011.81,728.35 2011.81,685.04 2023.62,673.23 2023.62,543.31 2255.91,311.02 v2(2255.91,279.53)
  Bottom Layer w7.87: v2(2255.91,279.53) HDR_B1.73@2255.91,338.58
IO34: HDR_B1.75 U4.AF22 | length 951.3
  Top Layer w5: U4.AF22@1858.27,984.25 1858.27,968.5 1866.14,960.63 1866.14,937.01 1874.02,929.13 1874.02,921.26 1874.02,909.45 1874.02,881.89 2059.05,696.85 2059.05,685.04 2047.24,673.23 2047.24,551.18 2287.4,311.02 v2(2287.4,279.53)
  Bottom Layer w7.87: v2(2287.4,279.53) HDR_B1.75@2287.41,338.58
IO35: HDR_B1.77 U4.AE22 | length 994
  Top Layer w5: U4.AE22@1858.27,1023.62 1877.95,1003.94 1877.95,940.95 1885.83,933.07 1885.83,921.26 1885.83,909.45 1885.83,889.76 2074.8,700.79 2074.8,685.04 2086.61,673.23 2086.61,543.31 2318.9,311.02 v2(2318.9,279.53)
  Bottom Layer w7.87: v2(2318.9,279.53) HDR_B1.77@2318.9,338.58
KBCLOCK: HDR_T1.26 U4.A17 | length 832.6
  Top Layer w5: v2(1500,2665.35) 1500,2476.38 1645.67,2330.71 1645.67,2271.65 1633.86,2259.84 1633.86,2224.41 1661.42,2196.85 1661.42,2039.37 1661.42,2031.5 U4.A17@1661.42,1968.5
  Bottom Layer w7.87: HDR_T1.26@1500,2606.3 v2(1500,2665.35)
KBDATA: HDR_T1.28 U4.B17 | length 912.6
  Top Layer w5: v2(1531.5,2688.98) 1531.5,2515.75 1531.5,2468.5 1669.29,2330.71 1669.29,2271.65 1677.17,2263.78 1677.17,2039.37 1677.17,2031.5 1677.17,1988.19 1681.1,1984.25 1681.1,1948.82 U4.B17@1661.42,1929.13
  Bottom Layer w7.87: HDR_T1.28@1531.5,2606.3 v2(1531.5,2688.98)
LED0: HDR_B1.6 U4.AD7 | length 490.9
  Top Layer w7.87: v1(1248.03,1043.3) U4.AD7@1267.72,1062.99
  MidLayer1 w5: v2(1185.04,665.35) 1185.04,696.85 1208.66,720.47 1208.66,909.45 1208.66,921.26 1208.66,980.31 1248.03,1019.68 v1(1248.03,1043.3)
  Bottom Layer w7.87: HDR_B1.6@1185.04,606.3 v2(1185.04,665.35)
LED1: HDR_B1.8 U4.AC8 | length 533.6
  Top Layer w7.87: v1(1287.4,1082.67) U4.AC8@1307.09,1102.36
  MidLayer1 w5: v2(1216.54,688.98) 1216.54,708.66 1224.41,716.54 1224.41,909.45 1224.41,921.26 1224.41,972.44 1267.72,1015.75 1267.72,1062.99 v1(1287.4,1082.67)
  Bottom Layer w7.87: HDR_B1.8@1216.54,606.3 v2(1216.54,688.98)
LED2: HDR_B1.10 U4.AD8 | length 481.2
  Top Layer w7.87: v1(1287.4,1043.3) U4.AD8@1307.09,1062.99
  MidLayer1 w5: v2(1248.03,665.35) 1248.03,822.83 1267.72,842.52 1267.72,909.45 1267.72,921.26 1267.72,996.06 1287.4,1015.74 v1(1287.4,1043.3)
  Bottom Layer w7.87: HDR_B1.10@1248.03,606.3 v2(1248.03,665.35)
LED3: HDR_B1.12 U4.AC9 | length 523.8
  Top Layer w7.87: v1(1326.77,1082.67) U4.AC9@1346.46,1102.36
  MidLayer1 w5: v2(1279.53,688.98) 1291.34,700.79 1291.34,909.45 1291.34,921.26 1307.09,937.01 1307.09,1062.99 v1(1326.77,1082.67)
  Bottom Layer w7.87: HDR_B1.12@1279.53,606.3 v2(1279.53,688.98)
LED4: HDR_B1.14 U4.AC10 | length 530.3
  Top Layer w7.87: v1(1366.14,1082.67) U4.AC10@1385.83,1102.36
  MidLayer1 w5: v2(1311.02,665.35) 1311.02,696.85 1350.39,736.22 1350.39,909.45 1350.39,921.26 1350.39,1023.62 1346.46,1027.56 1346.46,1062.99 v1(1366.14,1082.67)
  Bottom Layer w7.87: HDR_B1.14@1311.03,606.3 v2(1311.02,665.35)
LED5: HDR_B1.16 U4.AD10 | length 474.6
  Top Layer w7.87: v1(1366.14,1043.3) U4.AD10@1385.83,1062.99
  MidLayer1 w5: v2(1342.52,688.98) 1366.14,712.6 1366.14,909.45 1366.14,921.26 v1(1366.14,1043.3)
  Bottom Layer w7.87: HDR_B1.16@1342.52,606.3 v2(1342.52,688.98)
LED6: HDR_B1.18 U4.AC11 | length 517.3
  Top Layer w7.87: v1(1405.51,1082.67) U4.AC11@1425.2,1102.36
  MidLayer1 w5: v2(1374.02,665.35) 1374.02,688.98 1385.83,700.79 1385.83,909.45 1385.83,921.26 1385.83,1062.99 v1(1405.51,1082.67)
  Bottom Layer w7.87: HDR_B1.18@1374.02,606.3 v2(1374.02,665.35)
LED7: HDR_B1.20 U4.AD11 | length 471.4
  Top Layer w7.87: v1(1405.51,1043.3) U4.AD11@1425.2,1062.99
  MidLayer1 w5: v2(1405.51,688.98) 1405.51,704.72 1397.64,712.6 1397.64,909.45 1397.64,921.26 1397.64,1007.87 1405.51,1015.75 v1(1405.51,1043.3)
  Bottom Layer w7.87: HDR_B1.20@1405.51,606.3 v2(1405.51,688.98)
LED_PGM: LED1.2 U2.4 | length 255.9
  Top Layer w7.87: LED1.2@1295.28,165.35 1301.18,165.35 1425.2,165.35 v1(1468.5,122.05)
  Bottom Layer w7.87: U2.4@1431.51,112.95 1435.5,111.55 U2.4@1440.94,109.65 ; U2.4@1433.07,125.98 1435.04,125.98 1438.97,122.05 v1(1468.5,122.05) ; U2.4@1440.94,104.33 U2.4@1440.94,109.65 ; U2.4@1440.94,122.05 1440.94,110.24 U2.4@1440.94,109.65
LED_PWR: LED2.1 R2.2 | length 102.8
  Top Layer w15.75: v1(1893.7,169.29) LED2.1@1935.04,169.29 LED2.1@1937.01,169.29
  Bottom Layer w15.75: v1(1893.7,169.29) R2.2@1953.23,169.29
LX: L5.1 U5.1 U5.3 U5.14 U5.16 | length 727.1
  Top Layer w15.75: U5.16@2592.58,1633.25 2660.81,1633.25 v3@2669.29,1641.73 ; U5.14@2592.58,1683.25 2651.4,1683.25 ; 2653.54,1681.1 2651.4,1683.25 ; v3@2669.29,1677.17 2663.21,1683.25 2651.4,1683.25 ; 2748.03,1641.73 2756.52,1633.25 U5.1@2824.58,1633.25 ; 2748.03,1677.17 2754.11,1683.25 U5.3@2824.58,1683.25
  Bottom Layer w78.74: 2377.95,1948.82 2653.54,1673.23 v3@2669.29,1673.23
  other v3: 2661.42,1641.73 2690.96,1641.73 2720.5,1641.73 2661.42,1669.29 2690.96,1669.29 2720.5,1669.29 2661.42,1696.85 2690.96,1696.85 2720.5,1696.85
MOUSECLOCK: HDR_T1.30 U4.A18 | length 826
  Top Layer w5: v2(1562.99,2665.35) 1562.99,2476.38 1639.78,2399.59 1708.66,2330.71 1708.66,2271.65 1692.91,2255.91 1692.91,2039.37 1692.91,2031.5 1692.91,1992.13 1700.79,1984.25 U4.A18@1700.79,1968.5
  Bottom Layer w7.87: HDR_T1.30@1562.99,2606.3 v2(1562.99,2665.35)
MOUSEDATA: HDR_T1.32 U4.B18 | length 932.2
  Top Layer w5: v2(1594.49,2688.98) 1594.49,2468.5 1619.95,2443.04 1732.28,2330.71 1732.28,2271.65 1744.09,2259.84 1744.09,2248.03 1708.66,2212.6 1708.66,2039.37 1708.66,2031.5 1708.66,1996.06 1720.47,1984.25 1720.47,1948.82 U4.B18@1700.79,1929.13
  Bottom Layer w7.87: HDR_T1.32@1594.49,2606.3 v2(1594.49,2688.98)
MSEL0: R13.2 U4.P20 | length 406.4
  Top Layer w7.87: U4.P20@1779.53,1456.69 v1(1799.22,1437.01)
  MidLayer4 w5: v1(1799.22,1437.01) 1842.52,1480.31 2062.99,1480.31 v1(2110.24,1433.07)
  Bottom Layer w5: v1(2110.24,1433.07) R13.2@2140.23,1433.07
MSEL1: R12.2 U4.P21 | length 373.5
  Top Layer w7.87: U4.P21@1818.9,1456.69 v1(1838.59,1437.01)
  MidLayer4 w5: v1(1838.59,1437.01) 1870.08,1468.5 2035.43,1468.5 v1(2110.24,1393.7)
  Bottom Layer w5: v1(2110.24,1393.7) R12.2@2140.23,1393.7
NCONFIG: R14.2 U4.N7 | length 951
  Top Layer w7.87: v1(1248.03,1515.75) U4.N7@1267.72,1496.06
  MidLayer3 w5: v1(948.82,1870.08) 948.82,1893.7 984.25,1929.13 984.25,1960.63 1023.62,2000 v1(1023.62,2102.36)
  MidLayer4 w5: v1(948.82,1870.08) 948.82,1708.66 996.06,1661.42 996.06,1594.49 1035.43,1555.12 1035.43,1519.68 1070.87,1484.25 1216.54,1484.25 v1(1248.03,1515.75)
  Bottom Layer w5: R14.2@1015.75,2132.36 1015.75,2114.18 1023.62,2106.3 v1(1023.62,2102.36)
NetLED1_1: LED1.1 R1.2 | length 87.1
  Top Layer w7.87: v1(1181.1,169.29) LED1.1@1222.44,169.29
  Bottom Layer w7.87: v1(1181.1,169.29) R1.2@1226.85,169.29
NetR21_2: R21.2 R22.1 | length 60
  Top Layer w13.78: R21.2@2910.94,1866.14 R22.1@2970.94,1866.14
NetRN1_8: RN1.8 RN4.5 | length 91.3
  Bottom Layer w5: RN1.8@1688.58,3271.65 RN4.5@1779.53,3271.65 RN4.5@1779.92,3271.65
NetRN2_8: RN2.8 RN6.5 | length 91.3
  Bottom Layer w5: RN2.8@1393.3,3271.65 RN6.5@1483.28,3271.66 RN6.5@1484.64,3271.65
NEXUS_TCK: HDR_T1.82 U4.T21 | length 1873.4
  Top Layer w7.87: U4.T21@1818.9,1377.95 v1(1838.59,1358.27)
  MidLayer3 w5: v1(1838.59,1358.27) 1858.27,1338.58 1927.17,1338.58 1992.13,1338.58 2000,1330.71 2025.59,1330.71 2078.74,1330.71 2090.55,1330.71 2133.86,1330.71 2287.4,1484.25 2287.4,2027.56 2433.07,2173.23 2433.07,2263.78 2425.2,2271.65 2425.2,2381.89 2381.89,2425.2 v2(2381.89,2665.35)
  Bottom Layer w7.87: HDR_T1.82@2381.89,2606.3 v2(2381.89,2665.35)
NEXUS_TDI: HDR_T1.84 U4.U21 | length 1961.9
  Top Layer w7.87: U4.U21@1818.9,1338.58 v1(1838.59,1318.9)
  MidLayer3 w5: v1(1838.59,1318.9) 1858.27,1299.21 1980.31,1299.21 2000,1318.9 2078.74,1318.9 2090.55,1318.9 2153.54,1318.9 2299.21,1464.57 2299.21,2023.62 2444.88,2169.29 2444.88,2251.97 2464.57,2271.65 2464.57,2377.95 2413.38,2429.13 v2(2413.38,2688.98)
  Bottom Layer w7.87: HDR_T1.84@2413.39,2606.3 v2(2413.38,2688.98)
NEXUS_TDO: HDR_T1.76 U4.B24 | length 987.7
  Top Layer w5: U4.B24@1937.01,1929.13 1956.69,1948.82 1956.69,1976.38 1964.57,1984.25 1964.57,2031.5 1964.57,2039.37 1964.57,2070.87 2074.8,2181.1 2074.8,2259.84 2086.61,2271.65 2287.4,2472.44 v2(2287.4,2688.98)
  Bottom Layer w7.87: HDR_T1.76@2287.4,2606.3 v2(2287.4,2688.98)
NEXUS_TMS: HDR_T1.80 U4.T19 | length 1939
  Top Layer w7.87: U4.T19@1740.16,1377.95 v1(1759.84,1358.27)
  MidLayer3 w5: v1@1760.03,1358.08 1779.89,1377.95 1980.31,1377.95 2019.68,1417.32 2066.93,1417.32 2070.87,1413.39 2078.74,1413.39 2090.55,1413.39 2169.29,1413.39 2275.59,1519.69 2275.59,2031.5 2393.7,2149.61 2393.7,2263.78 2401.57,2271.65 2401.57,2366.14 2350.39,2417.33 v2(2350.39,2688.98)
  Bottom Layer w7.87: HDR_T1.80@2350.4,2606.3 v2(2350.39,2688.98)
NSTATUS: R18.2 U4.R22 | length 377.1
  Top Layer w7.87: U4.R22@1858.27,1417.32 v1(1877.96,1397.64)
  MidLayer4 w5: v1(1877.96,1397.64) 1897.64,1417.32 1897.64,1448.82 1905.51,1456.69 1964.57,1456.69 2070.87,1350.39 v1(2110.24,1350.39)
  Bottom Layer w5: v1(2110.24,1350.39) R18.2@2140.23,1350.39
ONE_WIRE.PIO2: U1.6
ONE_WIRE_DB_PB: HDR_B1.79 U4.Y12 | length 1843.4
  Top Layer w7.87: v1(1444.88,1200.78) U4.Y12@1464.57,1220.47
  MidLayer3 w5: v1(1444.88,1200.78) 1425.2,1181.1 1425.2,921.26 1425.2,909.45 1425.2,777.56 1385.83,738.19 1385.83,681.1 1740.16,326.77 2334.65,326.77 2350.39,311.02 v2(2350.39,248.03)
  Bottom Layer w7.87: v2(2350.39,248.03) HDR_B1.79@2350.4,338.58
ONE_WIRE_DBID: HDR_T1.92 U1.2 | length 314.2
  Bottom Layer w5: HDR_T1.92@2539.37,2606.3 2539.37,2678.98 2539.37,2805.12 2580.71,2846.46 U1.2@2637.59,2846.45
ONE_WIRE_PIO1: HDR_T1.91 U1.3 | length 1154.4
  Bottom Layer w5: HDR_T1.91@2539.37,2338.58 2539.37,2259.84 2539.37,2228.35 2551.18,2216.54 2775.59,2216.54 2787.4,2228.35 2787.4,2740.16 2779.53,2748.03 2736.22,2748.03 2712.6,2771.65 2712.6,2874.02 2690.16,2896.45 U1.3@2637.59,2896.45
REF_1V2: C133.2 U5.10 | length 86.8
  Top Layer w15.75: C133.2@2505.9,1783.46 2506.11,1783.25 U5.10@2592.58,1783.25
REF_CLK: HDR_B1.4 U4.AF14 | length 887.5
  Top Layer w5: U4.AF14@1543.31,984.25 1543.31,952.76 1562.99,933.07 1562.99,779.53 1582.68,759.84 1582.68,740.16 v1(1559.06,716.54)
  MidLayer1 w5: v2(1153.54,688.98) 1153.54,665.35 1177.17,641.73 1511.81,641.73 1519.68,649.61 1519.68,673.23 1511.81,681.1 1511.81,700.79 1527.56,716.54 v1(1559.06,716.54)
  Bottom Layer w7.87: HDR_B1.4@1153.55,606.3 v2(1153.54,688.98)
RS232_CTS: HDR_T1.22 U4.B15 | length 901.3
  Top Layer w5: v2(1437.01,2665.35) 1437.01,2472.44 1582.68,2326.77 1582.68,2271.65 1570.87,2259.84 1570.87,2251.97 1570.87,2248.03 1606.3,2212.6 1606.3,2086.61 1562.99,2043.31 1562.99,2039.37 1562.99,2031.5 1562.99,1948.82 U4.B15@1582.68,1929.13
  Bottom Layer w7.87: HDR_T1.22@1437.01,2606.3 v2(1437.01,2665.35)
RS232_RTS: HDR_T1.18 U4.B11 | length 885
  Top Layer w5: v2(1374.01,2665.35) 1374.01,2472.44 1480.31,2366.14 1480.31,2271.65 1488.19,2263.78 1488.19,2248.03 1405.51,2165.35 1405.51,2043.31 1405.51,2031.5 1405.51,1948.82 U4.B11@1425.2,1929.13
  Bottom Layer w7.87: HDR_T1.18@1374.02,2606.3 v2(1374.01,2665.35)
RS232_RX: HDR_T1.24 U4.B16 | length 922.4
  Top Layer w5: v2(1468.5,2688.98) 1468.5,2464.57 1606.3,2326.77 1606.3,2271.65 1618.11,2259.84 1618.11,2251.97 1618.11,2208.66 1641.73,2185.04 1641.73,2039.37 1641.73,2031.5 1641.73,1948.82 U4.B16@1622.05,1929.13
  Bottom Layer w7.87: HDR_T1.24@1468.5,2606.3 v2(1468.5,2688.98)
RS232_TX: HDR_T1.20 U4.A14 | length 902.6
  Top Layer w5: v2(1405.51,2688.98) 1405.51,2464.57 1543.31,2326.77 1543.31,2271.65 1555.12,2259.84 1555.12,2244.09 1594.49,2204.72 1594.49,2098.43 1543.31,2047.24 1543.31,2039.37 1543.31,2031.5 U4.A14@1543.31,1968.5
  Bottom Layer w7.87: HDR_T1.20@1405.51,2606.3 v2(1405.51,2688.98)
SCL: HDR_B1.5 U4.Y11 | length 1129.5
  Top Layer w7.87: v1(1405.51,1200.78) U4.Y11@1425.2,1220.47
  MidLayer3 w5: v2(1185.04,279.53) 1185.04,629.92 1287.4,732.28 1338.58,732.28 1385.83,779.53 1385.83,909.45 1385.83,921.26 1385.83,1181.1 v1(1405.51,1200.78)
  Bottom Layer w7.87: v2(1185.04,279.53) HDR_B1.5@1185.04,338.58
SDA: HDR_B1.3 U4.AA10 | length 1056.8
  Top Layer w7.87: v1(1366.14,1161.41) U4.AA10@1385.83,1181.1
  MidLayer3 w5: v2(1153.54,279.53) 1153.54,661.42 1346.46,854.33 1346.46,909.45 1346.46,921.26 1346.46,1141.73 v1(1366.14,1161.41)
  Bottom Layer w7.87: v2(1153.54,279.53) HDR_B1.3@1153.55,338.58
SLEEP_N: HDR_T1.93
SPI_CLK: HDR_T1.46 U4.F14 | length 1091.4
  Top Layer w7.87: U4.F14@1543.31,1771.65 v1(1562.99,1791.34)
  MidLayer2 w5: v1(1562.99,1791.34) 1543.31,1811.02 1543.31,2031.49 1543.31,2039.37 1543.31,2047.24 1740.16,2244.09 1740.16,2263.78 1728.35,2275.59 1728.35,2295.28 1814.96,2381.89 v2(1814.96,2665.35)
  Bottom Layer w7.87: HDR_T1.46@1814.96,2606.3 v2(1814.96,2665.35)
SPI_DIN: HDR_T1.44 U4.F13 | length 1206.1
  Top Layer w7.87: v1(1484.25,1791.34) U4.F13@1503.94,1771.65
  MidLayer2 w5: v1(1484.25,1791.34) 1464.57,1811.02 1464.57,1866.14 1464.57,1960.64 1484.25,1980.32 1484.25,2031.49 1484.25,2039.37 1484.25,2208.66 1507.87,2232.28 1606.3,2232.28 1646.13,2272.11 1649.61,2275.59 1649.61,2318.9 1704.72,2374.02 1704.72,2582.68 1783.46,2661.42 v2(1783.46,2688.98)
  Bottom Layer w7.87: HDR_T1.44@1783.47,2606.3 v2(1783.46,2688.98)
SPI_DOUT: HDR_T1.50 U4.F16 | length 1093.1
  Top Layer w7.87: U4.F16@1622.05,1771.65 v1(1641.73,1791.34)
  MidLayer2 w5: v1(1641.73,1791.34) 1622.05,1811.02 1622.05,1866.14 1622.05,1968.51 1645.67,1992.13 1645.67,2031.49 1645.67,2039.37 1645.67,2110.24 1767.72,2232.28 1787.4,2232.28 1803.15,2248.03 1803.15,2263.78 1795.28,2271.65 1795.28,2291.34 1877.95,2374.01 v2(1877.95,2665.35)
  Bottom Layer w7.87: HDR_T1.50@1877.95,2606.3 v2(1877.95,2665.35)
SPI_MODE: HDR_T1.52 U4.F17 | length 1135.8
  Top Layer w7.87: U4.F17@1661.42,1771.65 v1(1681.1,1791.34)
  MidLayer2 w5: v1(1681.1,1791.34) 1661.42,1811.02 1661.42,2031.49 1661.42,2039.37 1661.42,2107.28 1774.61,2220.47 1803.15,2220.47 1822.83,2240.16 1822.83,2259.84 1909.45,2346.46 v2(1909.45,2688.98)
  Bottom Layer w7.87: HDR_T1.52@1909.45,2606.3 v2(1909.45,2688.98)
SPI_SEL: HDR_T1.48 U4.F15 | length 1125.6
  Top Layer w7.87: U4.F15@1582.68,1771.65 v1(1602.36,1791.34)
  MidLayer2 w5: v1(1602.36,1791.34) 1582.68,1811.02 1582.68,2031.5 1582.62,2039.37 1582.62,2066.87 1763.78,2248.03 1763.78,2263.78 1775.59,2275.59 1775.59,2287.4 1846.46,2358.27 v2(1846.46,2688.98)
  Bottom Layer w7.87: HDR_T1.48@1846.46,2606.3 v2(1846.46,2688.98)
SRAM1_A0: U4.AC18 U9.1 | length 1163.8
  Top Layer w7.87: U4.AC18@1700.79,1102.36 v1(1720.47,1082.67)
  MidLayer1 w5: v1(1720.47,1082.67) 1740.16,1062.99 1740.16,1007.87 1720.47,988.19 1720.47,921.26 1720.47,909.45 1720.47,870.08 1755.91,834.65 1771.65,818.9 1779.53,818.9 1870.08,728.35 v1(2523.62,728.35)
  Bottom Layer w5: U9.1@2478.44,728.34 v1(2523.62,728.35)
SRAM1_A1: U4.AC19 U9.2 | length 1160
  Top Layer w7.87: U4.AC19@1740.16,1102.36 v1(1759.84,1082.67)
  MidLayer1 w5: v1(1759.84,1082.67) 1779.53,1062.99 1779.53,937.01 1763.78,921.26 1763.78,909.45 1763.78,858.27 1775.59,846.46 1787.4,846.46 1874.02,759.84 v1(2547.24,759.84)
  Bottom Layer w5: U9.2@2478.44,759.83 v1(2547.24,759.84)
SRAM1_A2: U4.AD21 U9.3 | length 997.3
  Top Layer w7.87: U4.AD21@1818.9,1062.99 v1(1838.58,1043.3)
  MidLayer1 w5: v1(1838.58,1043.3) 1838.58,1035.44 1814.96,1011.81 1814.96,921.26 1814.96,909.45 1814.96,870.08 1838.58,846.46 1901.57,846.46 1956.69,791.34 v1(2523.62,791.34)
  Bottom Layer w5: U9.3@2478.44,791.33 v1(2523.62,791.34)